# Altium PCB 三代电容_power_1923.PcbDoc
Units mil, origin at the board's own origin, x right, y up, seen from the top; angles counter-clockwise.
Board outline 3228.35 x 2165.35 mil, 2 copper layers (Top Layer, Bottom Layer); 116 components, 52 nets, 297 pads, 572 vias.
Unrouted connection lines stored in the file: 33.
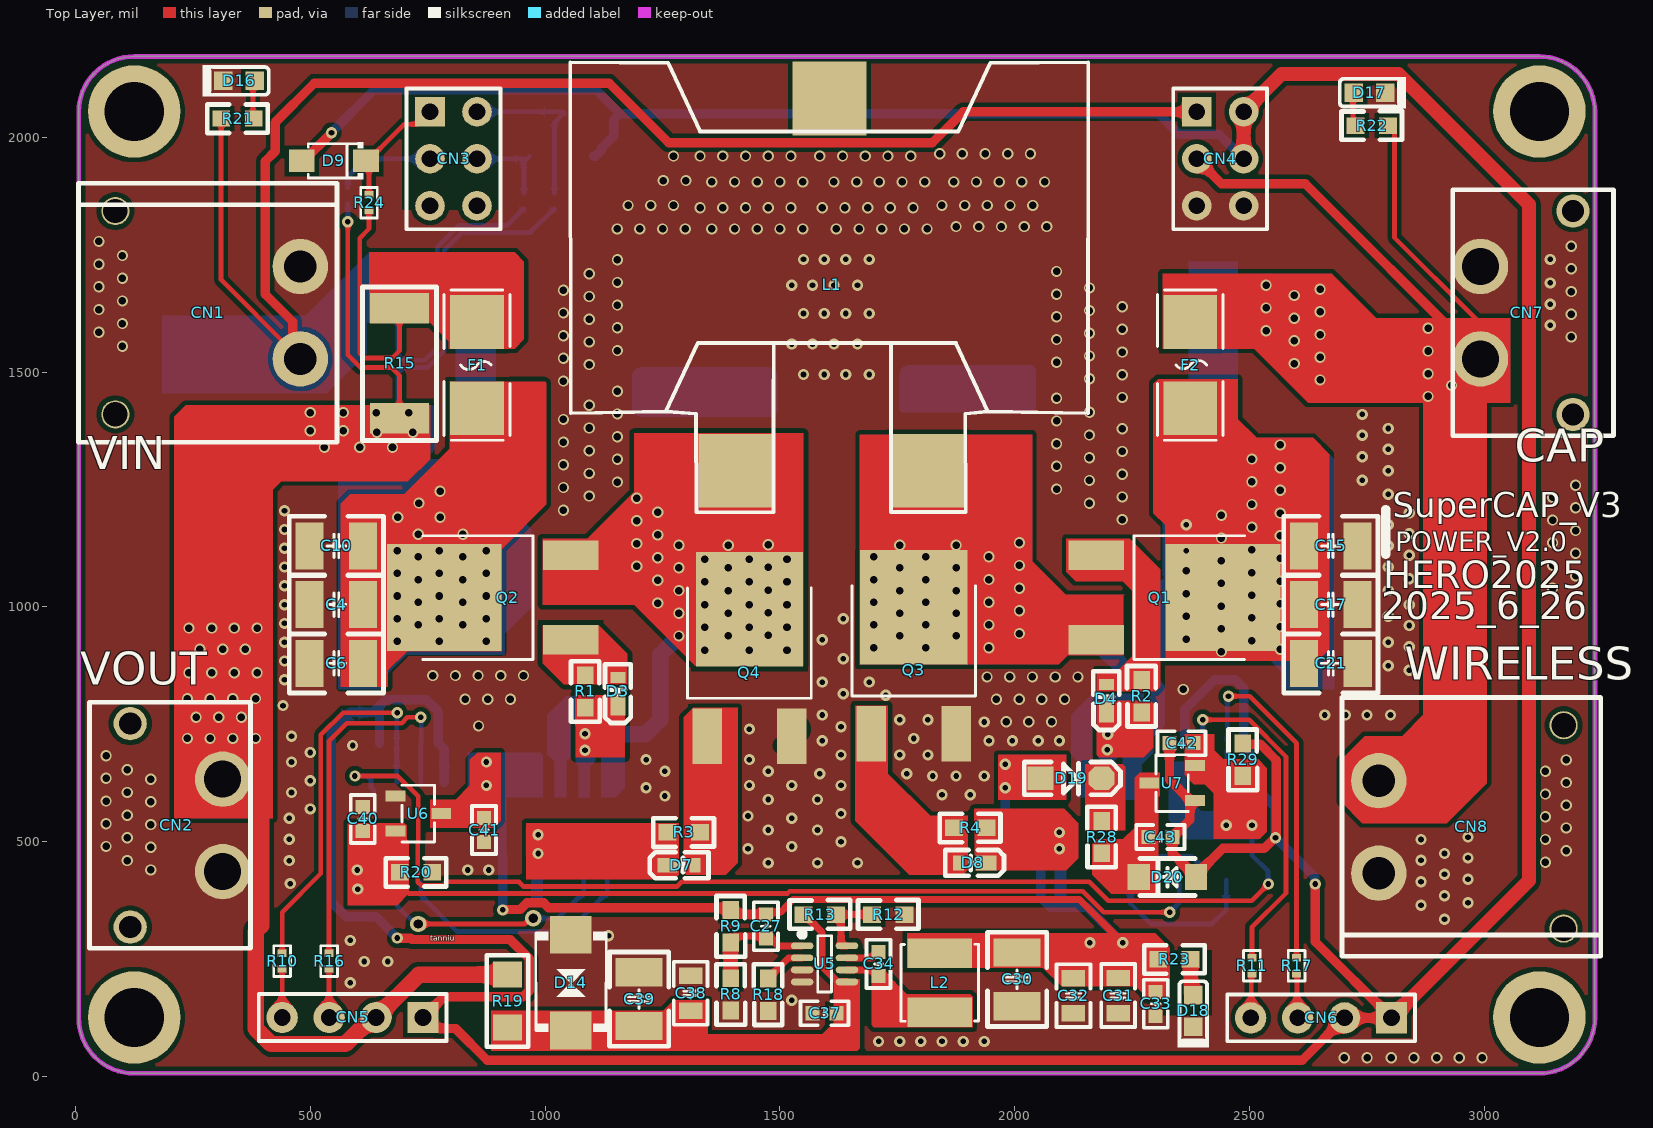
[diagram p0: Top Layer view]
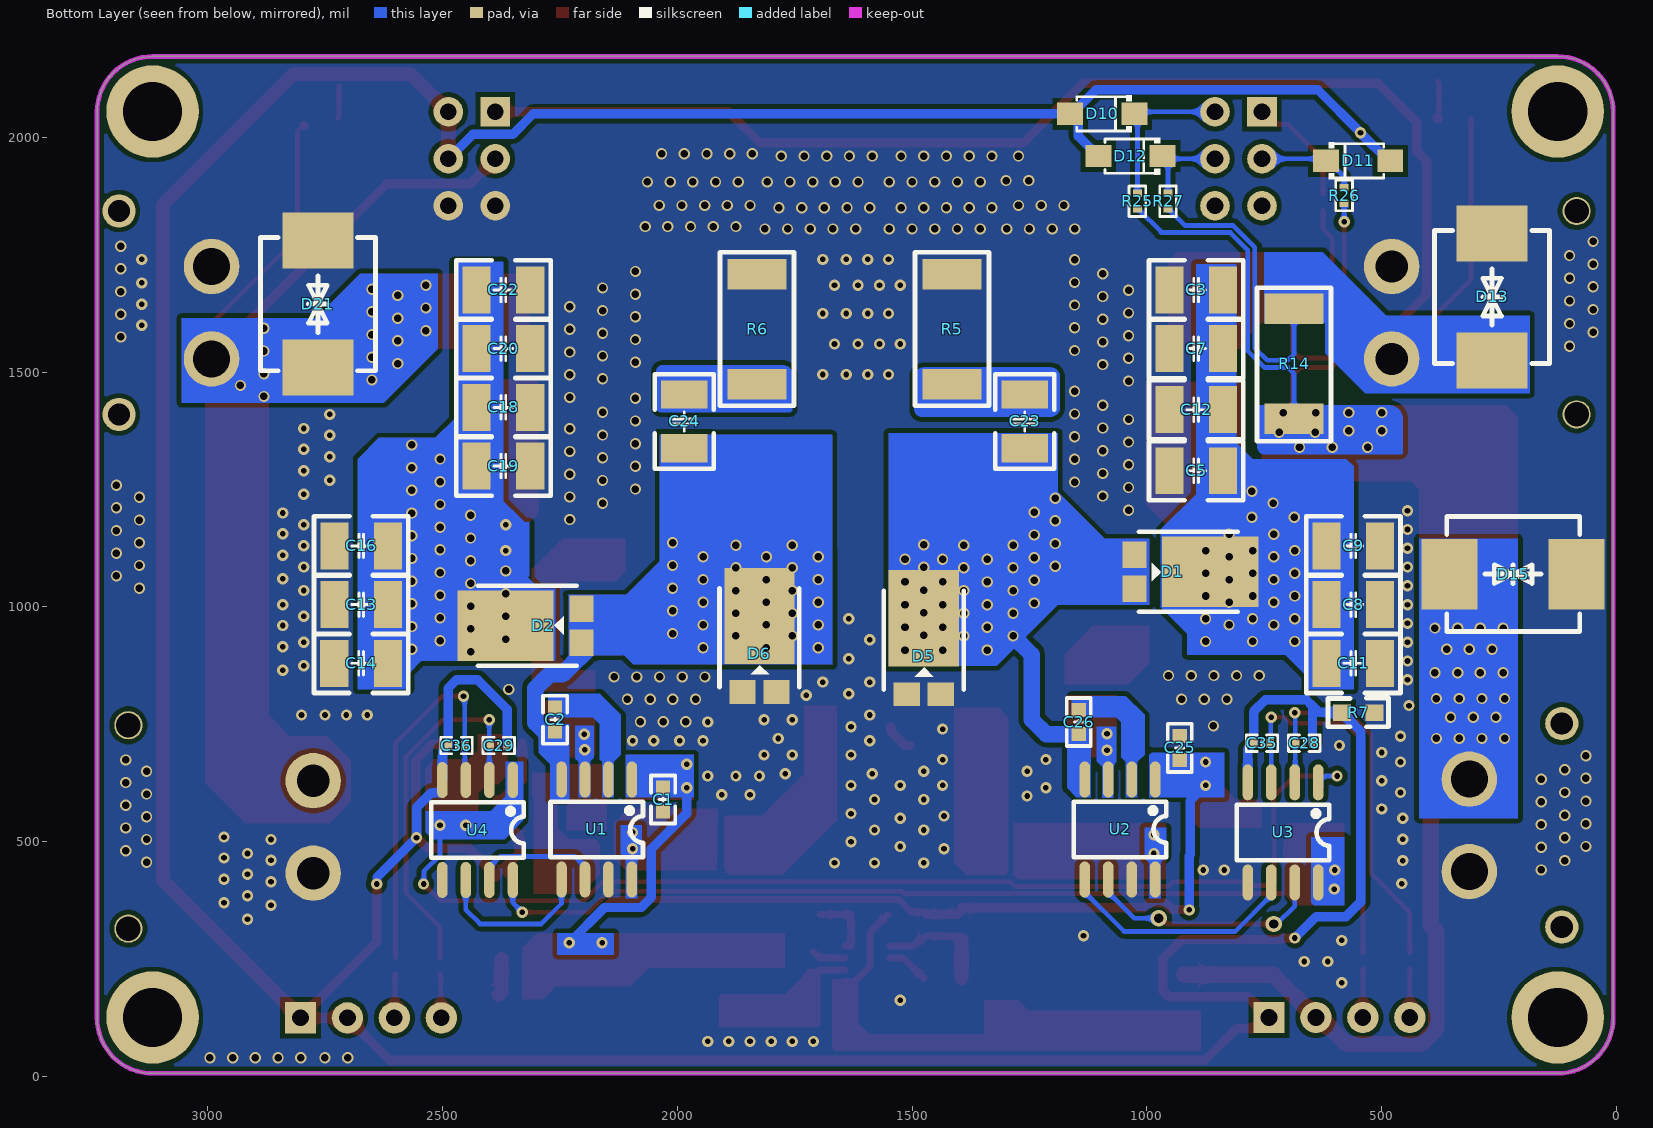
[diagram p1: Bottom Layer view, seen from below]

## Layer stack, top to bottom
Top Solder: solder mask 0.4, Solder Resist, Dk 3.5
Top Layer: signal copper 1.4
Dielectric 1: dielectric 12.6, FR-4, Dk 4.8
Bottom Layer: signal copper 1.4
Bottom Solder: solder mask 0.4, Solder Resist, Dk 3.5

## Board outline
6.89,125 6.89,2054.13 cw(c125,2054.13) 125,2172.24 3117.13,2172.24 cw(c3117.13,2054.13) 3235.24,2054.13 3235.24,125 cw(c3117.13,125) 3117.13,6.89 125,6.89 cw(c125,125)

## Design rules (kind name [scope] priority, off if disabled: settings)
Clearance [All] p1: gap=10 ignorepadtopadclearanceinfootprint=TRUE except(5: Arc-Arc Arc-Track Track-Track; 5.5: Arc-SMDPad Arc-THPad Arc-Via Arc-Text Arc-Hole Track-SMDPad Track-THPad Track-Via Track-Text Track-Hole Fill-Text Poly-Text Region-Text Text-Text; 6: SMDPad-SMDPad SMDPad-THPad SMDPad-Via SMDPad-Text SMDPad-Hole THPad-THPad THPad-Via THPad-Text THPad-Hole Via-Via Via-Text Via-Hole Fill-Hole Poly-Hole Region-Hole Text-Hole)
ComponentClearance [All] p1: gap=1 collisioncheckmode=3 verticalgap=1 showdistances=TRUE
DiffPairsRouting [All] p1: maxlimit=12 minlimit=8 mostfreqgap=10 toplayer_minwidth=8 toplayer_maxwidth=15 toplayer_prefwidth=10 bottomlayer_minwidth=8 bottomlayer_maxwidth=15 bottomlayer_prefwidth=10 maxuncoupledlength=500
HoleSize [All] p1: absolutevalues=TRUE maxlimit=1574.8 minlimit=11.81 maxpercent=80.000 minpercent=20.000
HoleToHoleClearance [All] p1: gap=19.68 allowstackedmicrovias=TRUE
MinimumSolderMaskSliver [All] p1: minsoldermaskwidth=0
NetAntennae [All] p1: netantennaetolerance=1
PasteMaskExpansion [All] p1: expansion=5
PlaneConnect [All] p1: pad.planeconnectstyle=Relief pad.reliefexpansion=20 pad.reliefentries=4 pad.reliefconductorwidth=25 pad.reliefairgap=10 via.planeconnectstyle=Direct via.reliefexpansion=20 via.reliefentries=4 via.reliefconductorwidth=25 via.reliefairgap=10
PolygonConnect [All] p1: connectstyle=Direct reliefconductorwidth=25 reliefentries=4 polygonreliefangle="90 Angle" airgapwidth=10
RoutingVias [All] p1: holewidth=20 width=35 viastyle="Through Hole" minholewidth=11.81 minwidth=23.62 maxholewidth=1574.8 maxwidth=1580.8
SilkToSilkClearance [All] p1: silktosilkclearance=0
SilkToSolderMaskClearance [IsPad] p1: minsilkscreentomaskgap=0 clearancetoexposedcopper=TRUE
SolderMaskExpansion [All] p1: expansion=5 istentingtop=FALSE
Width [All] p1: maxlimit=125 minlimit=5 preferedwidth=20
20 further rules are at their usual default settings.

## Components (designator, comment, footprint, x,y, rotation, side; value= is the part's Value field where it differs from the comment)
C1 "1uF/50V/0603" "C 0603_L" 2030,590 r270 bottom
C2 "1uF/25V/0603" "C 0603_L" 2260,760 r90 bottom
C3 "47uF/50V/1210" "C 1210_L" 895,1675 r0 bottom
C4 "47uF/50V/1210" "C 1210_L" 555.39,1005 r180 top
C5 "47uF/50V/1210" "C 1210_L" 895,1290 r0 bottom
C6 "47uF/50V/1210" "C 1210_L" 555.39,880 r180 top
C7 "47uF/50V/1210" "C 1210_L" 895,1550 r0 bottom
C8 "47uF/50V/1210" "C 1210_L" 560.39,1005 r180 bottom
C9 "47uF/50V/1210" "C 1210_L" 560.39,1130 r180 bottom
C10 "47uF/50V/1210" "C 1210_L" 555.39,1130 r180 top
C11 "47uF/50V/1210" "C 1210_L" 560.39,880 r180 bottom
C12 "47uF/50V/1210" "C 1210_L" 895,1420 r0 bottom
C13 "47uF/100V/1210" "C 1210_L" 2672.91,1005 r0 bottom
C14 "47uF/100V/1210" "C 1210_L" 2673.19,880 r0 bottom
C15 "47uF/100V/1210" "C 1210_L" 2672.91,1130 r0 top
C16 "47uF/100V/1210" "C 1210_L" 2672.91,1130 r0 bottom
C17 "47uF/100V/1210" "C 1210_L" 2672.91,1005 r0 top
C18 "47uF/100V/1210" "C 1210_L" 2370,1425 r180 bottom
C19 "47uF/100V/1210" "C 1210_L" 2370,1300 r180 bottom
C20 "47uF/100V/1210" "C 1210_L" 2370,1550 r180 bottom
C21 "47uF/100V/1210" "C 1210_L" 2673.19,880 r0 top
C22 "47uF/100V/1210" "C 1210_L" 2370,1675 r180 bottom
C23 "1nF/100V/1206" "C 1210_L" 1260,1395 r90 bottom
C24 "1nF/100V/1206" "C 1210_L" 1985,1395 r90 bottom
C25 "1uF/50V/0603" "C 0603_L" 930,700 r90 bottom
C26 "1uF/25V/0603" "C 0603_L" 1145,755 r270 bottom
C27 "22pF/50V/0603" "C 0603_L" 1470,320 r270 top
C28 "22pF/50V/0402" "C 0402_L" 665,710 r0 bottom
C29 "22pF/50V/0402" "C 0402_L" 2380,705 r0 bottom
C30 "47uF/50V/1210" "C 1210_L" 2005,207.09 r270 top
C31 "4.7uF/50V/0805" "C 0805_L" 2220,172.6 r270 top
C32 "1uF/50V/0805" "C 0805_L" 2125,172.4 r270 top
C33 "100nF/50V/0603" "C 0603_L" 2300,155 r270 top
C34 "10nF/50V/0603" "C 0603_L" 1710,240 r90 top
C35 "22pF/50V/0402" "C 0402_L" 755,710 r0 bottom
C36 "22pF/50V/0402" "C 0402_L" 2470,705 r0 bottom
C37 "100nF/50V/0603" "C 0603_L" 1595,135 r180 top
C38 "1uF/50V/0805" "C 0805_L" 1310,177.4 r90 top
C39 "47uF/50V/1210" "C 1210_L" 1200,165 r90 top
C40 "1uF/50V/0603" "C 0603_L" 611.58,548.61 r90 top
C41 "1uF/50V/0603" "C 0603_L" 870,525 r270 top
C42 "1uF/50V/0603" "C 0603_L" 2355,710 r180 top
C43 "1uF/50V/0603" "C 0603_L" 2310,510 r0 top
CN1 "XT30" "XT30 -WS公头" 281.85,1626.54 r90 top
CN2 "XT30" "XT30 -WS母头" 215,535 r90 top
CN3 "排针2*3" HDR2.54-LI-2x3P 804.92,1954.13 r270 top
CN4 "排针2*3" HDR2.54-LI-2x3P 2437.2,1954.13 r270 top
CN5 "排针1*4" HDR2.54-LI-4P 589.96,125.87 r180 top
CN6 "排针1*4" HDR2.54-LI-4P 2652.17,125 r180 top
CN7 "XT30" "XT30 -WS母头" 3090,1626.53 r270 top
CN8 "XT30" "XT30 -WS公头" 2971.85,531.57 r270 top
D1 "SB10150_C2922190" TO-277_3P-L5.4-W4.0-LS6.5-TR 945.85,1075 r0 bottom
D2 "SB10150_C2922190" TO-277_3P-L5.4-W4.0-LS6.5-TR 2285,960 r180 bottom
D3 "CDBVRL140-HF" LED-SMD_L1.6-W0.8-RD-2 1155,820 r90 top
D4 "CDBVRL140-HF" LED-SMD_L1.6-W0.8-RD-2 2195,805 r90 top
D5 "SB10150_C2922190" TO-277_3P-L5.4-W4.0-LS6.5-TR 1475,895 r270 bottom
D6 "SB10150_C2922190" TO-277_3P-L5.4-W4.0-LS6.5-TR 1825,900 r270 bottom
D7 "CDBVRL140-HF" LED-SMD_L1.6-W0.8-RD-2 1290,450 r0 top
D8 "CDBVRL140-HF" LED-SMD_L1.6-W0.8-RD-2 1910,455 r180 top
D9 "SMF50A" SOD-123FL_L2.7-W1.8-LS3.8-RD 550,1950 r180 top
D10 "SMF50A" SOD-123FL_L2.7-W1.8-LS3.8-RD 1095,2050 r0 bottom
D11 "SMF50A" SOD-123FL_L2.7-W1.8-LS3.8-RD 550,1950 r180 bottom
D12 "SMF50A" SOD-123FL_L2.7-W1.8-LS3.8-RD 1035,1960 r0 bottom
D13 "SMCJ30CA" SMC_L6.9-W5.9-LS7.9-BI 265,1660 r270 bottom
D14 "SMBJ30CA" SMB_L4.3-W3.6-LS5.4-BI 1055,200 r90 top
D15 "SMCJ30CA" SMC_L6.9-W5.9-LS7.9-BI 220,1070 r0 bottom
D16 "LED" LED_0603 348.47,2120 r0 top
D17 "LED" LED_0603 2755,2095 r180 top
D18 "LED" LED_0603 2380,140 r90 top
D19 "SS14" SOD-123 2120,635 r0 top
D20 "SMF17A" SOD-123FL_L2.8-W1.8-LS3.6-RD 2325,425 r0 top
D21 "SMCJ30CA" SMC_L6.9-W5.9-LS7.9-BI 2765,1645 r270 bottom
F1 "FUSE_18A" FUSE-SMD_L6.1-W2.6 855,1515 r270 top
F2 "FUSE_18A" FUSE-SMD_L6.1-W2.6 2373.58,1515 r90 top
L1 "22uH/30A" PQ2918贴片式 1610,1772.24 r0 top
L2 "33uH/0.9A" IND-SMD_L4.0-W4.0 1840,200 r90 top
Q1 "AOD66923" TO-252-2_L6.6-W6.1-P4.57-LS9.9-BR-CW 2308.58,1020 r180 top
Q2 "AOD66923" TO-252-2_L6.6-W6.1-P4.57-LS9.9-BR-CW 920,1020 r0 top
Q3 "AOD66923" TO-252-2_L6.6-W6.1-P4.57-LS9.9-BR-CW 1784.84,864.81 r270 top
Q4 "AOD66923" TO-252-2_L6.6-W6.1-P4.57-LS9.9-BR-CW 1435,860 r270 top
R1 "10R/0603" "R 0603_L" 1085,820 r90 top
R2 "10R/0603" "R 0603_L" 2270,810 r270 top
R3 "10R/0603" "R 0603_L" 1295,520 r0 top
R4 "10R/0603" "R 0603_L" 1905,530 r0 top
R5 "15R/2010/1W" "R 2512_L" 1415,1590 r90 bottom
R6 "15R/2010/1W" "R 2512_L" 1830,1590 r90 bottom
R7 "0R/0603" "R 0603_L" 550,775 r0 bottom
R8 "10k/0603" "R 0603_L" 1395,175 r90 top
R9 "205k/0603" "R 0603_L" 1395,320 r90 top
R10 "0R/0402" "R 0402_L" 440,245 r90 top
R11 "0R/0402" "R 0402_L" 2505,235 r90 top
R12 "30k/0603" "R 0603_L" 1730.5,345 r180 top
R13 "100k/0603" "R 0603_L" 1585,345 r180 top
R14 "3mR/2512/3W" "R 2512_L" 686.63,1518.47 r270 bottom
R15 "3mR/2512/3W" "R 2512_L" 690,1520 r270 top
R16 "0R/0402" "R 0402_L" 540,245 r90 top
R17 "0R/0402" "R 0402_L" 2600,235 r90 top
R18 "47k/0603" "R 0603_L" 1475,174.5 r270 top
R19 "0R/1206/0.25w" "R 1206_L" 920,160 r90 top
R20 "27k/0603" "R 0603_L" 725,435 r0 top
R21 "47k/0603" "R 0603_L" 345,2040 r0 top
R22 "47k/0603" "R 0603_L" 2760,2025 r180 top
R23 "10k/0603" "R 0603_L" 2340,250 r0 top
R24 "1R/0402" "R 0402_L" 625,1860 r90 top
R25 "1R/0402" "R 0402_L" 1020,1865 r270 bottom
R26 "1R/0402" "R 0402_L" 580,1875 r90 bottom
R27 "1R/0402" "R 0402_L" 955,1865 r270 bottom
R28 "100R/0603" "R 0603_L" 2185,510 r270 top
R29 "27k/0603" "R 0603_L" 2485,674.5 r90 top
U1 "MP1923GS-Z" SOIC-8_L5.0-W4.0-P1.27-LS6.0-BL 2171.38,526.26 r0 bottom
U2 "MP1923GS-Z" SOIC-8_L5.0-W4.0-P1.27-LS6.0-BL 1057.2,526.26 r0 bottom
U3 "π120U31" SOIC-8_L5.0-W4.0-P1.27-LS6.0-BL 710,520 r0 bottom
U4 "π120U31" SOIC-8_L5.0-W4.0-P1.27-LS6.0-BL 2425,525 r0 bottom
U5 "SY8303AIC" TSOT-23-8_L2.9-W1.6-P0.65-LS2.8-BR 1595,240 r180 top
U6 "SE8650X2-HF" SOT-23-3_L2.9-W1.6-P1.90-LS2.8-BR 730,560 r180 top
U7 "SE8650X2-HF" SOT-23-3_L2.9-W1.6-P1.90-LS2.8-BR 2335,625 r0 top

## Footprints (in the part's own frame and the unit in brackets; to place one, negate y for a bottom-side part, rotate by r counter-clockwise, add the part's x,y. Pads: shape width x height; smd on the part's side, far side on the other; paste and mask are expansions set on the pad)
"C 0402_L" [mm] "无极性贴片电容"
  rect 0.4x0.5 smd: 1(-0.45,0) 2(0.45,0)
  silkscreen extent -0.86,-0.45 0.85,0.45, body extent -0.5,-0.26 0.5,0.26, height 0.53
"C 0603_L" [mil] "无极性贴片电容"
  rect 30x30 smd: 1(-25.59,0) 2(25.59,0)
  silkscreen extent -51,-26 51,26, body extent -31,-16 31,16, height 32
"C 0805_L" [mil] "无极性贴片电容"
  rect 35x50 smd: 1(-37.4,0) 2(37.4,0)
  silkscreen extent -67,-36 67,36, body extent -39,-24 39,24, height 20
"C 1210_L" [mil] "无极性贴片电容"
  rect 60x100 smd: 1(-57.09,0) 2(57.09,0)
  silkscreen extent -100,-63 100,63, body extent -63,-51 63,51, height 60
FUSE-SMD_L6.1-W2.6 [mil]
  rect 114.6x114.6 smd mask+2: 1(-91.7,0) 2(91.7,0)
  silkscreen extent -160,-70 160,70, body extent -120,-53 120,53, height 109
HDR2.54-LI-2x3P [mm]
  rect 1.6x1.6 hole 0.9: 1(-2.54,-1.27)
  round 1.6 hole 0.9: 2(-2.54,1.27) 3(0,-1.27) 4(0,1.27) 5(2.54,-1.27) 6(2.54,1.27)
  silkscreen extent -3.81,-2.54 3.81,2.54, body extent -3.81,-2.54 3.81,2.54, height 8.5
HDR2.54-LI-4P [mm] "排针，4脚"
  rect 1.7x1.7 hole 0.9: 1(-3.81,0)
  round 1.7 hole 0.9: 2(-1.27,0) 3(1.27,0) 4(3.81,0)
  silkscreen extent -5.08,-1.27 5.08,1.27, body extent -5.08,-1.27 5.08,1.27, height 8.5
IND-SMD_L4.0-W4.0 [mm]
  rect 1.6x3.5 smd: 1(-1.6,0) 2(1.6,0)
  silkscreen extent -2.08,-2.1 2.08,2.1
LED-SMD_L1.6-W0.8-RD-2 [mm]
  rect 0.6x0.8 smd: 1(0.75,0)
  rect 1.1x0.8 smd: 2(-0.75,0)
  silkscreen extent -1.7,-0.7 1.47,0.7
LED_0603 [mm]
  rect 1x1 smd paste+0 mask+0: 1(0.85,0) 2(-0.85,0)
  silkscreen extent -1.97,-0.85 1.6,0.85, body extent -0.92,-0.53 1.09,0.53, height 0.46
PQ2918贴片式 [mm] "功率电感封装"
  rect 4x4 smd: 0(-0.109,7.882) 1(-5.207,-12.249) 2(5.207,-12.249)
  silkscreen extent -14.14,-14.5 13.87,9.84, body extent -13.95,-15.77 13.95,11.27, height 17.72
"R 0402_L" [mm] "1/16W贴片电阻"
  rect 0.4x0.5 smd: 1(-0.4,0) 2(0.45,0)
  silkscreen extent -0.8,-0.45 0.85,0.45, body extent -0.5,-0.25 0.5,0.25, height 0.3
"R 0603_L" [mil] "1/10W"
  rect 38x35 smd: 1(-34.5,0) 2(34.5,0)
  silkscreen extent -64,-31 64,30, body extent -34,-16 28,16, height 18
"R 1206_L" [mil] "1/4W高精度贴片电阻"
  rect 55x62 smd: 1(-55.12,0) 2(57.09,0)
  silkscreen extent -96,-44 98,44, body extent -63,-31 63,32, height 22
"R 2512_L" [mm] "1W高精度贴片电阻"
  rect 1.65x3.2 smd: 1(-2.95,0) 2(3,0)
  silkscreen extent -4.1,-2 4.2,2, body extent -3.2,-1.6 3.2,1.6, height 0.55
SMB_L4.3-W3.6-LS5.4-BI [mil]
  rect 80.61x88.23 smd: 1(-102.02,0) 2(102.02,0)
  silkscreen extent -105,-75 108,75
SMC_L6.9-W5.9-LS7.9-BI [mm]
  rect 3.03x3.82 smd mask+0.051: 1(-3.435,0) 2(3.435,0)
  silkscreen extent -3.6,-3.11 3.6,3.11, body extent -3.94,-2.9 3.96,2.9, height 2.45
SOD-123 [mil] "2.7x1.6X1.1mm（长宽高，不包括引脚）"
  rect 55x50 smd: 1(-65,0)
  oct 55x50 smd: 2(65,0)
  silkscreen extent -100,-35 105,35, body extent -73,-31 73,31, height 48
SOD-123FL_L2.7-W1.8-LS3.8-RD [mm]
  rect 1.4x1.2 smd: 1(-1.735,0) 2(1.735,0)
  silkscreen extent -1.6,-1 1.38,1
SOD-123FL_L2.8-W1.8-LS3.6-RD [mm]
  rect 1.2x1.4 smd: 1(-1.55,0) 2(1.55,0)
  silkscreen extent -1.5,-1 1.5,1
SOIC-8_L5.0-W4.0-P1.27-LS6.0-BL [mil]
  oval 22.38x76.78 smd: 1(-75,-106.5) 2(-25,-106.5) 3(25,-106.5) 4(75,-106.5) 5(75,106.5) 6(25,106.5) 7(-25,106.5) 8(-75,106.5)
  silkscreen extent -98,-59 98,59
SOT-23-3_L2.9-W1.6-P1.90-LS2.8-BR [mm]
  rect 1.07x0.6 smd: 1(1.235,-0.95) 2(1.235,0.95) 3(-1.235,0)
  silkscreen extent -0.88,-1.54 0.88,1.54
TO-252-2_L6.6-W6.1-P4.57-LS9.9-BR-CW [mm]
  rect 3x1.6 smd mask+0.051: 1(3.424,-2.29) 3(3.424,2.29)
  rect 6.2x5.8 smd mask+0.051: 2(-3.424,0)
  silkscreen extent -4.58,-3.35 1.38,3.35, body extent -6,-3.29 3.7,3.29, height 2.3
TO-277_3P-L5.4-W4.0-LS6.5-TR [mm]
  rect 1.29x1.422 smd: 1(2.054,0.92) 3(2.054,-0.92)
  rect 5.2x3.8 smd: 2(-2.054,0)
  silkscreen extent -3.54,-2.16 1.8,2.16
TSOT-23-8_L2.9-W1.6-P0.65-LS2.8-BR [mil]
  oval 48.1x14.3 smd mask+2: 1(47.7,-38.4) 2(47.7,-12.8) 3(47.7,12.8) 4(47.7,38.4) 5(-47.7,38.4) 6(-47.7,12.8) 7(-47.7,-12.8) 8(-47.7,-38.4)
  silkscreen extent -15,-69 54,60, body extent -55,-57 55,57, height 39
"XT30 -WS公头" [mm]
  round 3 hole 1.74: 1(-2.5,-5) 2(2.5,-5)
  round 1.524 hole 1.321: x(-5.5,5) x(5.5,5)
  silkscreen extent -7,-6.98 7,7, body extent -6.78,-6.22 6.52,7.73, height 5
"XT30 -WS母头" [mm]
  round 1.8 hole 1.2: 0(-5.5,2.5) 0(5.5,2.5)
  round 3 hole 2: 1(2.5,-2.5) 2(-2.5,-2.5)
  silkscreen extent -6.65,-4 6.65,4.7, body extent -6.65,-3.52 6.65,10.52, height 5.1

## Part data
C1 C2 C25 C26 C28 C29 C35 C36 C40 C41 C42 C43: library part CAP, "陶瓷电容Ceramic Capacitor;16V;X7R;1206"
C3 C4 C5 C6 C7 C8 C9 C10 C11 C12 C13 C14 C15 C16 C17 C18 C19 C20 C21 C22 C23 C24 C27 C30 C31 C32 C33 C34 C37 C38 C39: library part CAP, "陶瓷电容"
CN1 CN2 CN7 CN8: "电源端子", BOM_Manufacturer="Changzhou Amass Elec", BOM_Manufacturer Part=XT30UPB-F, BOM_Supplier=LCSC, BOM_Supplier Part=C108769, Contributor=LCSC, nameAlias=Value, spicePre=C, spiceSymbolName=XT30UPB-F
CN3 CN4 CN5 CN6: "2.54排针"
D1 D2 D5 D6: "10A肖特基", Average Rectified Current (Io)=10A, Forward Voltage (Vf@If)=900mV@10A, JLCPCB Part Class="Extended Part", LCSC Part Name="电压:150V 电流:10A", Manufacturer=GOODWORK(固得沃克), Manufacturer Part=SB10150, Reverse Leakage Current (Ir)=20uA@150V, Reverse Voltage (Vr)=150V, Add into BOM=yes, Convert to PCB=yes, Datasheet=https://atta.szlcsc.com/upload/public/pdf/source/20211009/AF8C3589B27F0CCB5AD5E667BFB17F78.pdf, Device=SB10150_C2922190, Diode Configuration=独立式, Supplier=LCSC, Supplier Footprint=TO-277, Supplier Part=C2922190, Symbol=SB10150_C2922190
D3 D4 D7 D8: Forward Voltage (Vf@If)=550mV@700mA, JLCPCB Part Class="Extended Part", LCSC Part Name="电压:40V 电流:1A", Manufacturer=Comchip(典琦), Rectified Current=1A, Reverse Leakage Current (Ir)=50uA@40V, Reverse Voltage (Vr)=40V, Add into BOM=yes, Convert to PCB=yes, Datasheet=https://atta.szlcsc.com/upload/public/pdf/source/20240116/3D60EEEEF0718EF97C1BF0B00CBFA01B.pdf, Device=CDBVRL140-HF, Manufacturer Part=CDBVRL140-HF, Supplier=LCSC, Supplier Footprint=0603, Supplier Part=C3758192, Symbol=CDBVRL140-HF
D9 D10 D11 D12: library part SMF30A_C19077518, "单向 30V", Breakdown Voltage=33.3V, JLCPCB Part Class="Extended Part", LCSC Part Name=SMF30A, Manufacturer=宏迦橙, Maximum Clamping Voltage=48.4V, Operating Temperature=-55℃~+155℃, Peak Pulse Current (Ipp)=4.1A, Peak Pulse Power Dissipation (Ppp)=200W, Reverse Leakage Current (Ir)=1uA, Reverse Stand-Off Voltage (Vrwm)=30V, Add into BOM=yes, Convert to PCB=yes, Datasheet=https://atta.szlcsc.com/upload/public/pdf/source/20241029/BBF9A11676F655A5C9D4546A153AB943.pdf, Device=SMF30A_C19077518, Manufacturer Part=SMF30A, Number of Lines=单路, Polarity=单向, Supplier=LCSC, Supplier Footprint=SOD-123FL, Supplier Part=C19077518, Symbol=SMF30A_C19077518, Type=TVS
D13 D15: library part SMCJ36CA, "TVS 双向 26V", Breakdown Voltage (Min)=40V, JLCPCB Part Class="Extended Part", LCSC Part Name="双向 36V", Manufacturer=FTR(乔光电子), Maximum Clamping Voltage=58.1V, Peak Pulse Current (Ipp)@10/1000μs=25.9A, Reverse Stand-Off Voltage (Vrwm)=36V, Add into BOM=yes, Convert to PCB=yes, Datasheet=https://atta.szlcsc.com/upload/public/pdf/source/20200701/C693507_A69D3CDD819DBFEBDB935C1CCCEED4E5.pdf, Device=SMCJ36CA, Manufacturer Part=SMCJ36CA, Name=SMCJ36CA, Polarity=双向, Supplier=LCSC, Supplier Footprint=SMC(DO-214AB), Supplier Part=C693507, Symbol=SMCJ36CA_C693507
D14: library part SMBJ30CA_C83847, Breakdown Voltage=33.3V, JLCPCB Part Class="Extended Part", Manufacturer=Littelfuse(美国力特), Maximum Clamping Voltage=48.4V, Peak Pulse Current (Ipp)@10/1000us=12.4A, Peak Pulse Power Dissipation (Ppp)@10/1000us=600W, Reverse Stand-Off Voltage (Vrwm)=30V, Add into BOM=yes, Convert to PCB=yes, Datasheet=https://atta.szlcsc.com/upload/public/pdf/source/20190807/C409416_D98C874D944FBE9BE31A2BD6B7A21533.pdf, Device=SMBJ30CA_C83847, LCSC Part Name=SMBJ30CA, Manufacturer Part=SMBJ30CA, Supplier=LCSC, Supplier Footprint=SMB(DO-214AA), Supplier Part=C83847, Symbol=SMBJ30CA_C83847, Type=TVS
D16 D17 D18: "发光二极管"
D19: "肖特基二极管", BOM名称=肖特基二极管, 属性=40V/1A
D20: library part SMF17A_C2857278, "17V 单向", Breakdown Voltage=18.9V, JLCPCB Part Class="Extended Part", Manufacturer=JSMSEMI(杰盛微), Maximum Clamping Voltage=27.6V, Peak Pulse Current (Ipp)=7.2A, Reverse Leakage Current (Ir)=1uA, Reverse Stand-Off Voltage (Vrwm)=17V, Add into BOM=yes, Convert to PCB=yes, Datasheet=https://atta.szlcsc.com/upload/public/pdf/source/20220120/4066B4D37095FB947F97BAEB950D8525.pdf, Device=SMF17A_C2857278, LCSC Part Name=SMF17A, Manufacturer Part=SMF17A, Supplier=LCSC, Supplier Footprint=SOD-123FL, Supplier Part=C2857278, Symbol=SMF17A_C2857278, Type=TVS
D21: library part SMCJ54CA, "TVS 双向 30V", Breakdown Voltage (Min)=40V, JLCPCB Part Class="Extended Part", LCSC Part Name="双向 36V", Manufacturer=FTR(乔光电子), Manufacturer Part=SMCJ36CA, Maximum Clamping Voltage=58.1V, Peak Pulse Current (Ipp)@10/1000μs=25.9A, Reverse Stand-Off Voltage (Vrwm)=36V, Add into BOM=yes, Convert to PCB=yes, Datasheet=https://atta.szlcsc.com/upload/public/pdf/source/20200701/C693507_A69D3CDD819DBFEBDB935C1CCCEED4E5.pdf, Device=SMCJ36CA, Name=SMCJ36CA, Polarity=双向, Supplier=LCSC, Supplier Footprint=SMC(DO-214AB), Supplier Part=C693507, Symbol=SMCJ36CA_C693507
F1 F2: library part FUSE, "保险丝", Breaking Capacity @ Rated Voltage=50A, Current Rating=5A, JLCPCB Part Class="Extended Part", LCSC Part Name="5A 125V 超快断", Manufacturer=Littelfuse(美国力特), Manufacturer Part=0451005.MRL, Nominal Cold Resistance=12.5mΩ, Nominal Voltage Drop=-, Operating Temperature="-55°C ~ 125°C", Rated Voltage(AC)=125V, Add into BOM=yes, Convert to PCB=yes, Datasheet=https://atta.szlcsc.com/upload/public/pdf/source/20171109/C48467_15102201734031103760.pdf, Device=0451005.MRL, Fuse Type=快速熔断, Melting I²t=5.566, Name=0451005.MRL, Product=贴片式保险丝, Supplier=LCSC, Supplier Footprint=SMD, Supplier Part=C48467, Symbol=0451005.MRL
L1: library part L-FWHC, "扁平线大电流电感", BOM名称=功率磁环电感
L2: library part L-SMDP, "贴片功率电感", BOM名称=功率电感
Q1 Q2 Q3 Q4: "NMOS 100V 58A", BOM_JLCPCB Part Class="Extended Part", BOM_Manufacturer="Yangzhou Yangjie Elec Tech", BOM_Manufacturer Part=YJL3400A, BOM_Supplier=LCSC, BOM_Supplier Part=C699302, Contributor=LCSC, spicePre=Q, spiceSymbolName=YJL3400A
R1 R2 R3 R4 R7 R8 R9 R10 R11 R12 R13 R16 R17 R18 R20 R21 R22 R23 R24 R25 R26 R27 R28 R29: library part RES, "贴片电阻"
R5 R6 R14 R15 R19: library part RES_P, "功率电阻"
U1 U2: JLCPCB Part Class="Extended Part", LCSC Part Name=电源IC, Manufacturer=SCT(芯洲科技), Manufacturer Part=SCT2450STER, Add into BOM=yes, Convert to PCB=yes, Datasheet=https://atta.szlcsc.com/upload/public/pdf/source/20200407/C509400_EDF779A672A59398CFBA9E95FA584FEC.pdf, Device=SCT2450STER, Supplier=LCSC, Supplier Footprint=ESOP-8, Supplier Part=C509400, Symbol=SCT2450STER
U3 U4: "隔离器", Isolation Voltage(Vrms)=3000, JLCPCB Part Class="Extended Part", LCSC Part Name="增强型ESD 3.0kVrms/6.0kVrms 150Kbps双通道数字隔离器", Manufacturer="2Pai Semi(荣湃)", Add into BOM=yes, Convert to PCB=yes, Data Rate(Max)=150Kbps, Datasheet=https://atta.szlcsc.com/upload/public/pdf/source/20191223/C471588_CD8CD4905F4DCC0F3407249B7C47B378.pdf, Device=π120U31, Manufacturer Part=π120U31, Number of Forward Channels=2, Number of Reverse Channels=0, Supplier=LCSC, Supplier Footprint=SOIC-8, Supplier Part=C471588, Symbol=π120U31
U5: "DCDC ADJ 3A", Input Voltage=-, JLCPCB Part Class="Extended Part", LCSC Part Name=降压型, Manufacturer=矽力杰silergy, Add into BOM=yes, Convert to PCB=yes, Datasheet=https://atta.szlcsc.com/upload/public/pdf/source/20170308/1488958431714.pdf, Device=SY8303AIC, Function=降压型, Manufacturer Part=SY8303AIC, Name=SY8303AIC, Number of Outputs=-, Output Current (Max)=-, Supplier=LCSC, Supplier Footprint=TSOT-23-8, Supplier Part=C97054, Switching Frequency=-, Symbol=SY8303AIC, Synchronous Rectification=-, Topology=-
U6 U7: "5V_LDO", JLCPCB Part Class="Extended Part", LCSC Part Name="输入80V 输出5V 200mA", Manufacturer=SEAWARD(思旺), Output Current=-, Output Voltage=5V, standby current=2uA, Voltage - Supply=80V, Voltage Dropout=700mV@(100mA), Add into BOM=yes, Convert to PCB=yes, Datasheet=https://atta.szlcsc.com/upload/public/pdf/source/20231204/E5912244F6D9E24D718D6BDA01187AC7.pdf, Device=SE8650X2-HF, Features=短路保护(SCP)；低ESR；热关断(TSD)；带使能, Manufacturer Part=SE8650X2-HF, Number of Outputs=1, Output Configuration=正极, Output Type=固定, Power Supply Rejection Ratio (PSRR)=-, Supplier=LCSC, Supplier Footprint=SOT-23, Supplier Part=C496615, Symbol=SE8650X2-HF

## Free pads (board coordinates)
  round 196.85 hole 125.98: 6(125,125.87) 6(125,2055) 6(3117.13,2055) 6(3117.13,125.87)

## Via types
v1: diameter 24, hole 16, Top Layer to Bottom Layer, tented both sides, 387 vias
v2: diameter 24, hole 12, Top Layer to Bottom Layer, 183 vias
v3: diameter 35, hole 20, Top Layer to Bottom Layer, 2 vias

## Nets (pads, with @x,y where several pads share a name; then routed paths per layer and width w, separated by ;. In a path a pad name is that pad's centre, name@x,y a point inside that pad or via, vN(x,y) a via of type N, cw(c..) or ccw(c..) an arc to the next point about the centre after c; other vN are vias at no path point)
D_INH1: CN5.3 R16.1 | length 103.4
  Top Layer w10: CN5.3 R16.1
D_INH2: CN6.3 R17.1 | length 95.1
  Top Layer w10: R17.1 2601.08,218.17 2601.08,126.08 CN6.3
D_INL1: CN5.4 R10.1 | length 103.4
  Top Layer w10: CN5.4 R10.1
D_INL2: CN6.4 R11.1 | length 95.4
  Top Layer w10: CN6.4 2503.58,126.42 2503.58,217.83 R11.1
DVCC5V: C42.1 R29.1 U3.1 U4.1 U7.2 | length 2407.1
  Top Layer w10: v2(595,640) 686.5,640 730,596.5 730,500.44 729.08,499.52 729.08,414.08 730,415 730,413.15 736.15,407 782.85,407 789,413.15 789,415 945,415 945,413.79 953.79,405 1281.21,405 1291.21,415 2158.79,415 2199.22,374.57 2504.57,374.57 v2(2540,410)
  Bottom Layer w10: v2(595,640) 620,640 629.28,630.72 629.28,615 635,609.28 U3.1@635,600 ; v2(2505,535) 2505,471.37 2539.37,437 2539.37,410.63 v2(2540,410)
  other v2: 2450,535
GND: C28.1 C29.1 C35.2 C36.2 C42.2 C43.2 CN4.2 CN4.4 CN5.1 CN6.1 CN6.2 D9.2 D10.2 D11.2 D12.2 D20.2 R7.2 R29.2 U3.4 U4.4 U7.1 | length 10725.9
  Top Layer w20: D9.2 485.63,1950 545,2009.37 v2(545,2010) ; v2(685,295) 685.77,294.23 714.1,294.23 716.33,292 925.51,292 966.5,251.01 966.5,183.17 953.04,169.71 840.9,169.71 840.6,170 784.09,170 CN5.1 763.43,102.4 809.31,102.4 876.72,35 2612.17,35 CN6.2 CN6.1 2640,287.17 v2(2640,410) ; C42.2 2329.41,632.56 U7.1@2374.37,587.6 ; U7.1 U7.1@2374.37,587.6 ; D20.2 D20.2@2386.02,428.94 ; R29.2 2485,707.5 2523,707.5 2556.86,673.64 2556.86,511.52 2555.77,510.43 2555,510.43 v2(2555,508.58) 2553.92,508.58 2531.59,486.26 2443.34,486.26 D20.2@2386.02,428.94 ; U7.1@2374.37,587.6 2372.56,585.79 2372.56,546.97 C43.2 2335.59,475.43 2368.46,442.56 2372.4,442.56 D20.2@2386.02,428.94
  Top Layer w30: CN4.4 CN4.2 2568.26,2135.18 2816.64,2135.18 3095,1856.83 3095,417.83 CN6.1
  Bottom Layer w20: D11.2 485.63,1950 545,2009.37 v2(545,2010) 636.13,2101.13 1108.24,2101.13 D10.2@1159.37,2050 ; C28.1 647.28,789.29 ; v2(685,295) 639.23,340.77 575.95,340.77 545,371.72 545,735.5 575.5,766 575.5,767.5 583,775 R7.2 585,775.5 633.5,775.5 647.28,789.29 ; U3.4 785,697.72 C35.2 772.71,777.29 747.5,802.5 660.5,802.5 647.28,789.29 ; D12.2 1107.25,1960 1120.87,1973.62 1120.87,1977.56 1145.75,2002.44 1145.75,2036.38 D10.2@1159.37,2050 ; C29.1 2362.28,782.28 2425,845 2470,845 2487.71,827.29 C36.2 2499.55,693.17 2499.55,631.95 U4.4 2500,604.94 2501.1,603.84 2524.44,603.84 2555,573.28 v2(2555,508.58) 2639.23,424.35 2639.23,410.77 v2(2640,410) ; CN4.4 2435.16,2006.18 2350.25,2006.18 2306.43,2050 D10.2 D10.2@1159.37,2050
HO1: D3.2 R1.1 U2.3
  other v2: 1085,695 1085,730
HO2: D4.2 R2.2 U1.3
  other v2: 2196.78,695.95 2197.98,728.84
LO1: D7.2 R3.1 U2.8
  other v2: 985,475 985,515
LO2: D8.2 R4.2 U1.8
  other v2: 2095,485 2095,520
NetC2_2: C2.2 U1.2
NetC3_1: C3.1 C4.1 C5.1 C6.1 C7.1 C8.1 C9.1 C10.1 C11.1 C12.1 D1.2 F1.2 Q2.2
  other v1: 685,926.67 775,926.67 875,926.67 730,961.67 825,961.67 685,975 775,975 875,975 730,1010 825,1010 685,1023.33 775,1023.33 875,1023.33 730,1058.33 825,1058.33 685,1071.67 775,1071.67 875,1071.67 730,1106.67 825,1106.67 685,1120 775,1120 875,1120 730,1155 825,1155 686.2,1191.21 776.2,1191.21 731.2,1221.21 776.2,1246.21
NetC13_1: C13.1 C14.1 C15.1 C16.1 C17.1 C18.1 C19.1 C20.1 C21.1 C22.1 D2.2 F2.1 Q1.2
  other v1: 2440,905 2565,910 2505,928.33 2365,931.67 2440,953.33 2565,958.33 2505,976.67 2365,980 2440,1001.67 2565,1006.67 2505,1025 2365,1028.33 2440,1050 2565,1055 2505,1073.33 2365,1076.67 2440,1098.33 2565,1103.33 2505,1121.67 2440,1146.67 2565,1151.67 2505,1170 2440,1195 2565,1200 2505,1218.33 2565,1248.33 2505,1266.67 2565,1296.67 2505,1315 2565,1345
  other v2: 2365,1120 2365,1175
NetC23_2: C23.2 R5.1
NetC24_2: C24.2 R6.1
NetC26_1: C26.1 U2.2
NetC27_2: C27.2 R8.2 R9.1 U5.1 | length 245.7
  Top Layer w15: R9.1@1395,290.5 1403.91,299.41 1470,299.41 1477.5,291.91 1483.09,291.91 1496.6,278.4 U5.1
  Top Layer w30: R8.2 R9.1 R9.1@1395,290.5
NetC28_2: C28.2 R10.2 U3.2 | length 842.5
  Top Layer w10: R10.2 440,350 522.5,432.5 522.5,727.5 570,775 v2(685,775)
  Bottom Layer w10: U3.2 684.14,627.36 684.14,781.09 685,780.23 v2(685,775)
NetC29_2: C29.2 R11.2 U4.2 | length 797.2
  Top Layer w10: v2(2400,760) 2498.78,760 2577.5,681.28 2577.5,390.68 2505,318.18 R11.2
  Bottom Layer w10: U4.2 v2(2400,760)
NetC34_1: C34.1 L2.1 U5.6 | length 268.6
  Top Layer w15: U5.6 1697.21,227.2 C34.1 ; L2.1@1816,161 L2.1
  Top Layer w30: C34.1 1770.91,153.5 1823.5,153.5 L2.1
NetC34_2: C34.2 U5.7 | length 72.6
  Top Layer w15: U5.7 1697.22,252.8 C34.2
NetC35_1: C35.1 R16.2 U3.3 | length 807.4
  Top Layer w10: R16.2 540,715 577.5,752.5 694.32,752.5 706.82,765 v2(735,765)
  Bottom Layer w10: U3.3 735,710 736.14,711.14 736.14,763.86 v2(735,765)
NetC36_1: C36.1 R17.2 U4.3 | length 824.3
  Top Layer w10: v2(2455,810) 2500,810 2600,710 R17.2
  Bottom Layer w10: U4.3 2452.37,633.87 2452.37,807.37 v2(2455,810)
NetC37_1: C37.1 C38.1 C39.1 D14.1 R13.2 R19.1 U5.5 | length 194.1
  Top Layer w15: R13.2 1552,345 1589.73,307.27 1589.73,234.78 1622.55,201.95 1642.35,201.95 U5.5
NetC43_1: C43.1 D20.1 R28.2 U7.3
NetCN3_1: CN3.1 D9.1 R24.2 | length 254.8
  Top Layer w10: R24.2 625,1943.31 D9.1 622.25,1950 699.88,2027.64 728.43,2027.64 CN3.1
NetCN3_2: CN3.2 D10.1 R25.1 | length 368.5
  Bottom Layer w10: CN3.2 1037.56,2054.13 1041.69,2050 1038.63,2050 1020,2031.38 R25.1
NetCN3_3: CN3.3 D11.1 R26.2 | length 213.8
  Bottom Layer w10: R26.2 580,1915.62 614.37,1950 D11.1 622.44,1954.13 CN3.3
NetCN3_4: CN3.4 D12.1 R27.1 | length 197.1
  Bottom Layer w10: CN3.4 955.82,1954.13 955,1953.31 R27.1 ; D12.1@950.82,1944.13 D12.1
NetD3_1: D3.1 Q2.1 R1.2 | length 27.6
  Top Layer w35: Q2.1@1027.25,929.84 Q2.1
NetD4_1: D4.1 Q1.1 R2.1 | length 19.8
  Top Layer w35: Q1.1 Q1.1@2187.77,1096.16
NetD7_1: D7.1 Q4.1 R3.2 | length 27.6
  Top Layer w35: Q4.1@1344.84,697.64 Q4.1
NetD8_1: D8.1 Q3.1 R4.1
NetD16_1: D16.1 R21.2 | length 74.4
  Top Layer w10: R21.2@377.97,2050 377.97,2116.04 D16.1
  Top Layer w20: R21.2 R21.2@381.48,2041.98
NetD17_1: D17.1 R22.2 | length 71.6
  Top Layer w10: D17.1@2720,2110 2720,2043.96 R22.2@2723.96,2040
NetD18_1: D18.1 R23.2 | length 78.8
  Top Layer w30: R23.2 2374.5,178.96 D18.1
NetD19_2: D19.2 R28.1
NetR12_2: R12.2 R13.1 U5.8 | length 145.1
  Top Layer w15: U5.8 1630.35,278.4 1630,278.75 1630,345 R12.2
NetR18_1: R18.1 U5.2 | length 91.3
  Top Layer w15: R18.1 1475,210.5 1485,220.5 1486.5,220.5 1518.45,252.45 1546.95,252.45 U5.2
P_INH1: U2.5 U3.6 | length 518.2
  Bottom Layer w10: U3.6 735,386.3 812.3,309 1048.65,309 1132.2,392.56 U2.5
P_INH2: U1.5 U4.6 | length 348.6
  Bottom Layer w10: U1.5 2246.38,368.62 2290,325 2419.74,325 2450,355.25 U4.6
P_INL1: U2.6 U3.7 | length 518.5
  Top Layer w10: v3(730,325) 956.24,325 968.24,337 v3(975,337)
  Bottom Layer w10: U3.7 685,363.24 723.24,325 v3(730,325) ; v3(975,337) 1026.65,337 1082.2,392.56 U2.6
P_INL2: U1.6 U4.7 | length 276.5
  Bottom Layer w10: U1.6 2196.38,446.96 2218.06,468.65 2377.05,468.65 2400,445.7 U4.7
PGND: C1.2 C3.2 C4.2 C5.2 C6.2 C7.2 C8.2 C9.2 C10.2 C11.2 C12.2 C13.2 C14.2 C15.2 C16.2 C17.2 C18.2 C19.2 C20.2 C21.2 C22.2 C25.2 C30.2 C31.2 C32.2 C33.2 C37.2 C38.2 C39.2 C40.2 C41.2 CN1.2 CN2.2 CN4.5 CN4.6 CN7.2 CN8.2 D5.1 D5.3 D6.1 D6.3 D13.1 D14.2 D15.1 D16.2 D17.2 D18.2 D21.1 Q3.3 Q4.3 R5.2 R6.2 R7.1 R8.1 R12.1 R18.2 R20.2 U1.7 U2.7 U3.5 U4.5 U5.3 U5.4 U6.1 | length 62.4
  Top Layer w20: Q4.3@1505,705 1515,705 1545,735 Q4.3@1545,745
  other v1: 2701.67,40 2750,40 2801.67,40 2850,40 2898.33,40 2946.67,40 2995,40 160,440 3130,456.67 110,460 3173.95,481.05 160,488.33 65,490 3130,505 110,508.33 3173.95,529.38 160,536.67 65,538.33 3130,553.33 110,556.67 3173.95,577.71 160,585 65,586.67 3130,601.67 110,605 3173.95,626.05 160,633.33 65,635 3130,650 110,653.33 3173.95,674.38 65,683.33 858.19,746.78 1981.64,755.68 2029.97,755.68 2078.31,755.68 829.48,803.27 877.81,803.27 926.15,803.27 1960.92,803.26 2009.25,803.26 2057.59,803.26 2105.92,803.26 2358.95,824.38 1941.05,851.05 1989.38,851.05 2037.71,851.05 2086.05,851.05 2134.38,851.05 760.62,853.95 808.95,853.95 857.29,853.95 905.62,853.95 953.95,853.95 3145,1040 3193.95,1066.05 3145,1088.33 3193.95,1114.38 3145,1136.67 3193.95,1162.71 3145,1185 2228.95,1186.05 1038.95,1206.05 3193.95,1211.05 2158.95,1221.05 3145,1233.33 2228.95,1234.38 1093.95,1236.05 2088.95,1251.05 1038.95,1254.38 3193.95,1259.38 1153.95,1266.05 2158.95,1269.38 2228.95,1282.71 1093.95,1284.38 2088.95,1299.38 1038.95,1302.71 1153.95,1314.38 2158.95,1317.71 2228.95,1331.05 1093.95,1332.71 2088.95,1347.71 1038.95,1351.05 1153.95,1362.71 2158.95,1366.05 2228.95,1379.38 1093.95,1381.05 2088.95,1396.05 1038.95,1399.38 1153.95,1411.05 2158.95,1414.38 1093.95,1429.38 2088.95,1444.38 2228.95,1446.05 1153.95,1459.38 1038.95,1481.05 2158.95,1486.05 2228.95,1494.38 1093.95,1516.05 2088.95,1521.05 1038.95,1529.38 2158.95,1534.38 2228.95,1542.71 1153.95,1546.05 100,1555 1093.95,1564.38 2088.95,1569.38 3185,1575 1038.95,1577.71 2158.95,1582.71 50,1585 2228.95,1591.05 1153.95,1594.38 100,1603.33 1093.95,1612.71 2088.95,1617.71 3185,1623.33 1038.95,1626.05 2158.95,1631.05 50,1633.33 2228.95,1639.38 1153.95,1642.71 100,1651.67 1093.95,1661.05 2088.95,1666.05 3185,1671.67 1038.95,1674.38 2158.95,1679.38 50,1681.67 1153.95,1691.05 100,1700 1093.95,1709.38 2088.95,1714.38 3185,1720 50,1730 1153.95,1739.38 100,1748.33 3185,1768.33 50,1778.33 1153.33,1805 1201.67,1805 1250,1805 1298.33,1805 1355,1805 1403.33,1805 1451.67,1805 1500,1805 1548.33,1805 1620,1805 1668.33,1805 1716.67,1805 1765,1805 1813.33,1805 1875,1810 1923.33,1810 1971.67,1810 2020,1810 2068.33,1810 1330,1850 1378.33,1850 1426.67,1850 1475,1850 1523.33,1850 1590,1850 1638.33,1850 1686.67,1850 1735,1850 1783.33,1850 1176.67,1855 1225,1855 1273.33,1855 1845,1855 1893.33,1855 1941.67,1855 1990,1855 2038.33,1855 1355,1905 1403.33,1905 1451.67,1905 1500,1905 1548.33,1905 1615,1905 1663.33,1905 1711.67,1905 1760,1905 1808.33,1905 1870,1905 1918.33,1905 1966.67,1905 2015,1905 2063.33,1905 1251.42,1907.95 1299.75,1907.95 1273.33,1960 1330,1960 1378.33,1960 1426.67,1960 1475,1960 1523.33,1960 1585,1960 1633.33,1960 1681.67,1960 1730,1960 1778.33,1960 1840,1965 1888.33,1965 1936.67,1965 1985,1965 2033.33,1965
  other v2: 1710,75 1755,75 1800,75 1845,75 1890,75 1935,75 1525,162.5 585,200 615,245 665,245 585,290 1135,300 2915,335 2865,365 2965,370 2915,385 457.5,411.04 2865,415 2965,420 2915,430.62 835,440 880,440 1475,455 1580,455 1665,455 455,460 2865,460.62 2965,465.62 2915,475 1432,485 1525,490 1630,500 2865,505 455,505.62 2965,510 1475,525 1580,525 455,550 1525,550 1432,555 1630,560 500,570 1475,590 1580,590 1255,597.5 1845,600 1905,600 460,605 1215,615 1435,620 1525,620 1630,620 500,630 1825,640 1875,640 1935,640 1585,645 1770,645 1255,650 1475,650 460,670 1215,675 1435,675 1630,685 1755,685 1815,685 500,690 590,705 1590,715 1945,715 1995,715 2050,715 2095,715 1785,720 460,725 1435,740 1630,745 1935,755 1755,760 1815,760 1590,770 2660,770 2704.38,770 2750,770 2800,770 442,790 1725,812 1635,815 1590,840 1690,840 445,845 2840,865 2795,875 445,885 1635,890 2840,915 445,925 2795,925 1590,930 2840,960.62 445,965 1635,975 2795,980 445,1005 2840,1005 2795,1035 445,1045 2840,1060 445,1085 2795,1085 2840,1110 445,1125 2795,1130.62 2840,1155.62 445,1165 2795,1175 2840,1200 445,1205 2795,1240 2740,1270 2795,1290 2740,1320 2795,1335.62 2740,1365.62 2795,1380 2740,1410 1550,1495 1594.38,1495 1640,1495 1690,1495 1525,1560 1569.38,1560 1615,1560 1665,1560 3140,1600 1550,1625 1594.38,1625 1640,1625 1690,1625 3140,1644.38 1525,1685 1569.38,1685 1615,1685 1665,1685 3140,1690 1550,1740 1594.38,1740 1640,1740 1690,1740 3140,1740
PVCC5V: C40.1 R20.1 U3.8 U4.8 U6.2 | length 1731.6
  Top Layer w10: 700,400 710,390 1515.87,390 1520.87,395 2144.75,395 2189.75,350 v2(2330,350)
  Bottom Layer w10: v2(2330,350) 2350,370 U4.8
  other v2: 600.77,399.23 600,440
SW1: C23.1 C26.2 D1.1 D1.3 D5.2 L1.1 Q2.3 Q4.2 U2.4 | length 312
  Bottom Layer w20: v1@1285,937.25 v1(1285,938.33)
  Bottom Layer w35: C26.2 1214.41,729.41 1245,760 1245,898.33 v1(1285,938.33) ; v1@1240,1005 v1(1240,1008.33)
  other v1: 1340,908.33 1435,908.33 1515,908.33 1390,938.33 1475,939.31 1340,956.67 1435,956.67 1515,956.67 1285,986.67 1390,986.67 1475,987.65 1340,1005 1435,1005 1515,1005 1285,1035 1390,1035 1475,1035.98 1340,1053.33 1435,1053.33 1515,1053.33 1240,1056.67 1285,1083.33 1390,1083.33 1475,1084.31 1195,1086.67 1340,1101.67 1435,1101.67 1515,1101.67 1240,1105 1285,1131.67 1390,1131.67 1475,1132.65 1195,1135 1240,1153.33 1195,1183.33 1240,1201.67 1195,1231.67
SW2: C2.1 C24.1 D2.1 D2.3 D6.2 L1.2 Q1.3 Q3.2 U1.4 | length 311.9
  Bottom Layer w20: 2175,935 D2.3@2204.15,935 ; D2.3@2198.28,902.32 2198.28,917.91 D2.3
  Bottom Layer w35: D2.3@2198.28,902.32 2244.39,856.21 2272.07,856.21 2285.78,842.5 2286.39,842.5 2302.5,826.39 2302.5,753.61 2283.3,734.41 C2.1
  other v1: 1700,913.33 1810,913.33 1945,913.33 1755,938.33 1875,938.33 2010,943.33 1700,961.67 1810,961.67 1945,961.67 1755,986.67 1875,986.67 2010,991.67 1700,1010 1810,1010 1945,1010 1755,1035 1875,1035 2010,1040 1700,1058.33 1810,1058.33 1945,1058.33 1755,1083.33 1875,1083.33 2010,1088.33 1700,1106.67 1810,1106.67 1945,1106.67 1755,1131.67 1875,1131.67 2010,1136.67
VCC13V: C1.1 C25.1 C27.1 C30.1 C31.1 C32.1 C33.1 C41.1 D19.1 L2.2 R9.2 R23.1 U1.1 U2.1 U6.3 | length 2144
  Top Layer w15: C27.1@1470,350.59 1502.21,350.59 1511,359.38 1511,360.38 1528.12,377.5 2137.5,377.5 v2(2230,285)
  Top Layer w20: v2(910,355) 910.77,355.77 947.1,355.77 961.33,370 996.67,370 1007.17,359.5 R9.2@1395,359.5 ; R9.2 1395,353.09 1402.5,345.59 C27.1
  Bottom Layer w20: v2(875,620) 907.5,587.5 907.5,473.04 910,470.54 v2(910,355) ; v2(1980,615) 1980,560 2055,485 2055,381.72 2076.72,360 2155,360 v2(2230,285)
  other v2: 2160,285 1980,665 875,670
VCC24V: CN2.1 CN5.2 D15.2 R14.2 R15.2 R19.2 R25.2 R26.1 | length 2424.4
  Top Layer w10: v2(580,1820) 580,1536.72 606.72,1510 671.95,1510 690,1491.95 R15.2
  Top Layer w35: CN2.1 395.48,551.37 395.48,321.67 383.5,309.69 383.5,102.48 416.57,69.4 574.86,69.4 631.32,125.87 CN5.2 731.18,217.09 R19.2
  Bottom Layer w10: v2(580,1820) R26.1 ; R14.2 686.63,1496.63 700,1510 750,1510 785,1545 785,1760 822.14,1797.14 969.86,1797.14 969.86,1799.11 1018.03,1847.29 R25.2
  other v1: 238.33,720 286.67,720 335,720 383.33,720 256.67,765 305,765 353.33,765 238.33,805 286.67,805 335,805 383.33,805 241.67,860 290,860 338.33,860 386.67,860 265,910 313.33,910 361.67,910 241.67,955 290,955 338.33,955 386.67,955 530,1340 605,1340 675,1340 641.78,1371.7 718.46,1372.26 500,1375 570,1375 500,1414.02 570,1414.02 640,1414.02 710,1414.02
VCC24V_H: F1.1 R15.1 R24.1 | length 498.4
  Top Layer w10: R24.1 625,1805 605,1785 605,1540 615,1530 673.92,1530 690,1546.08 R15.1
VCC24V_IN: CN1.1 CN4.1 D13.2 R14.1 R21.1 R27.2 | length 3808.5
  Top Layer w10: R21.1 310,2039.5 310,1696.81 CN1.1@462.83,1543.98
  Top Layer w20: CN1.1 462.83,1543.98 462.83,1607.17 404.14,1665.86 404.14,1949.14 425,1970 425,2031.41 508.59,2115 1136.38,2115 1263.05,1988.33 1824.44,1988.33 1890.24,2054.13 CN4.1
  Bottom Layer w10: R14.1 686.63,1538.37 700,1525 743.79,1525 770,1551.21 770,1766.21 815.92,1812.14 917.89,1812.14 953.03,1847.29 R27.2
VCC_CAP: CN4.3 CN7.1 CN8.1 D21.2 F2.2 R22.1 | length 1283
  Top Layer w10: R22.1 2796,2025 2808.5,2012.5 2808.5,1786.5 2977.84,1617.16 2990,1605
  Top Layer w20: CN4.3 2440.21,1901.13 2618.55,1901.13 2977.84,1541.84 CN7.1 ; R22.1 R22.1@2794.75,2024.75
  other v1: 2880,1448.33 2930,1471.67 2650,1483.33 2880,1496.67 2595,1518.33 2650,1531.67 2880,1545 2595,1566.67 2650,1580 2535,1588.33 2880,1593.33 2595,1615 2650,1628.33 2535,1636.67 2595,1663.33 2650,1676.67 2535,1685
pads on no net: CN1.x CN2.0 CN3.5 CN3.6 CN7.0 CN8.x L1.0

## Polygon pours and split planes (outlines as drawn)
PGND on Bottom Layer "PGND_L02_P000" (solid, remove dead copper, pour order 0): -85,2255 -75,2265 3280,2265 3280,85 3065,-130 2985,-50 -120,-50
PGND on Top Layer "PGND_L01_P001" (solid, remove dead copper, pour order 1): -55,2250 3270,2250 3395,2125 3385,2115 3385,-160 -70,-160 -85,-175

## Keep-outs
Keep-Out Layer:
  the board outline again, w10

## Other copper
Top Layer:
  region net VCC_CAP: 2870,1435 2870,770 2825,725 2745,725 2695,675 2695,585 2740,540 2920,540 3005,625 3005,1435
  region net PVCC5V: 705,505 710,500 710,390 685,365 580,365 580,400 590,410 590,485
  region net NetC43_1: 2165,495 2165,430 2205.43,389.57 2305.09,389.57 2305.09,594.91 2305,595 2308.26,598.26 2308.26,647.22 2265.9,647.22 2255.18,636.5 2255.18,530.18 2230,505 2175,505
  region net DVCC5V: 2362.28,722.71 2361.63,722.06 2361.63,642.61 2381.33,622.91 2404.66,622.91 2424.1,603.46 2423.32,602.69 2423.32,506.26 2522.09,506.26 2536.86,521.03 2536.86,656.86 2517.94,675.79 2444.32,675.79 2424.88,695.23 2424.88,728.93 2362.41,728.93 2361.89,729.45
  region net NetD19_2: 2150,665 2230,665 2235,660 2235,525 2150,525 2150,530
  region net VCC13V: 1965,685 2110,685 2110,600 2110,595 2110,590 1965,590
  region net PVCC5V: 580,540 700,540 705,535 705,505 685,485 670,485 655,470 655,410 645,400 580,400
  region net VCC13V: 755,530 890,530 905,545 905,690 855,690 840,675 840,620 810,590 755,590
  region net NetC34_1: 1697.21,227.2 1695,224.99 1695,110 1700,105 1910,105 1910,170 1905,175 1770,175 1725,220 1725,230
  region net NetC37_1: 885,140 1251.6,140 1274,162.4 1345.99,162.4 1345.99,90 1590.59,90 1615,114.41 1615,207.5 1626.1,207.5 1670,207.5 1670,60 1665,55 885,55
  pour cut-out: 2310,275 2315,270 2420,270 2420,130 2315,130
  region net VCC13V: 1770.81,240 1770.81,232.22 2059.58,232.22 2099.65,192.14 2100.1,192.59 2257.28,192.59 2285.33,164.54 2330.3,164.54 2330.3,274.7 2299.31,305.69 1770.81,305.69
  region net LO1: 960,540 1285,540 1285,430 1275,420 960,420
  region net NetD4_1: 2175,820 2300,820 2310,830 2310,1080 2245,1145 2110,1145 2110,1075 2130,1055 2230,1055 2250,1035 2250,895 2220,865 2175,865
  region net HO2: 2180,680 2175,685 2175,800 2290,800 2295,795 2295,700 2275,680
  region net NetD8_1: 1660,790 1660,545 1775,430 1890,430 1900,440 1900,555 1820,555 1730,645 1730,790
  region net LO2: 1915.38,439.7 2109.7,439.7 2135,465 2135,540 2105,570 1913.65,570
  region net NetD7_1: 1315,785 1295,765 1295,435 1300,430 1385,430 1410,455 1410,785
  region net NetD3_1: 995,960 995,880 1040,835 1175,835 1175,900 1115,960
  region net HO1: 1065,680 1170,680 1170,812.34 1170.06,812.4 1064.44,812.4
  region net NetC3_1: 666.56,1240 710,1240 635,1165 630,1165
  region net NetC3_1: 705,905 665,865 665,830 660,830 655,830 565,830 565,1220 585,1240 666.56,1240
  region net VCC_CAP: 2315,1550 2510,1550 2625,1435 3055,1435 3055,1615 2770,1615 2675,1710 2315,1710
  region net NetC13_1: 2321.8,885 2645.2,885 2670,909.8 2670,1325 2635,1360 2515,1360 2475,1400 2475,1485 2305,1485 2295,1475 2295,1200 2320,1175
  region net NetC3_1: 797.36,1480.05 999.73,1480.05 1002.41,1477.37 1002.41,1218.25 907.11,1122.95 907.92,1122.14 907.92,905.71 664.05,905.71 664.05,1204.05 710.66,1250.66 796.6,1336.6 796.6,1480.72
  region net VCC24V_H: 625,1605 755,1605 794.61,1565.39 794.61,1550 935,1550 955,1570 955,1735 935,1755 625,1755
  region net VCC24V: 755,1430 755,1315 707.84,1267.84 437.84,1267.84 420,1250 420,550 210,550 210,1405 235,1430
  region net SW2: 1669.56,876.79 1670.79,878.02 2093.89,878.02 2114.18,898.31 2114.8,897.7 2231.03,897.7 2231.03,1023.77 2232.87,1025.61 2108.65,1025.61 2036.69,1097.56 2036.69,1366.92 1671.4,1366.92 1670.17,1365.69
  region net SW1: 995,1005 1190,1005 1320,875 1550,875 1550,1370 1190,1370 1190,1245 1090,1145 995,1145
  pour cut-out: 695,2110 905,2110 905,1845 695,1845
Bottom Layer:
  region net NetC23_2: 1185,1490 cw(c1205,1490) 1205,1510 1475,1510 cw(c1475,1490) 1495,1490 1495,1420 cw(c1480,1420) 1480,1405 1205,1405 cw(c1205,1425) 1185,1425
  region net NetC24_2: 1755,1495 1755,1420 ccw(c1760,1420) 1760,1415 2035,1415 ccw(c2035,1425) 2045,1425 2045,1500 ccw(c2030,1500) 2030,1515 1775,1515 ccw(c1775,1495)
  region net VCC24V: 630,1430 485,1430 ccw(c485,1400) 455,1400 455,1330 ccw(c460,1330) 460,1325 750,1325 ccw(c750,1340) 765,1340 765,1422.5 ccw(c762.5,1422.5) 762.5,1425
  region net VCC24V: 612.5,1365 ccw(c622.5,1365) 622.5,1355 757.5,1355 ccw(c757.5,1360) 762.5,1360 762.5,1425 ccw(c757.5,1425) 757.5,1430 617.5,1430 ccw(c617.5,1425) 612.5,1425
  region net VCC13V: 2135,260 2255,260 2255,305 2135,305
  region net DVCC5V: 2425,505 2520,505 2535,520 2535,565 2396.97,565 2365,596.97 2365,670 2330.69,670 2329.41,671.28 2327.86,669.73 2327.86,545.48 2367.57,505.77
  region net PVCC5V: 580,510 650,510 650,370 645,365 580,365
  region net VCC13V: 995,595 835,595 835,690 990,690 995,685
  region net LO2: 2085,380 2110,380 2110,465 2120,475 2120,535 2075,535 2075,470 2085,460
  region net VCC13V: 2110,595 1965,595 1965,685 2110,685
  region net NetC2_2: 2275,765 2275,815 2165,815 2120,770 2120,685 2135,670 2135,595 2160,595 2160,670 2165,675 2165,750 2180,765
  region net HO2: 2185,595 2210,595 2210,670 2217.21,677.21 2217.21,746.9 2177.35,746.9 2177.35,678.72 2184.81,671.25
  region net SW2: 2270,590 2270,665 2295,690 2295,750 2230,750 2230,590
  region net NetC26_1: 1020,595 1045,595 1045,670 1055,680 1055,755 1065,765 1160,765 1160,810 1045,810 1005,770 1005,685 1020,670
  region net SW1: 1120,595 1150,595 1170,615 1170,745 1120,745
  region net LO1: 995,380 995,455 1005,465 1005,530 958.78,530 958.78,467.2 970,455.98 970,380
  region net HO1: 1072.22,658.97 1071.9,658.65 1071.9,594.09 1094.37,594.09 1094.58,593.88 1094.58,659.58 1106.33,671.33 1106.33,745 1065,745 1065,670
  region net VCC24V: 210,1145 420,1145 420,550 210,550
  region net NetC13_1: 2315,1065 2315,1180 2325,1180 2380,1235 2385,1230 2385,1050
  region net NetC13_1: 2475,1400 2515,1360 2635,1360 2680,1315 2680,825 2570,825 2570,860 2545,885 2260,885 2260,1038.25 2260.49,1038.74 2293.74,1038.74 2370,1115 2370,1735 2475,1735
  region net NetC3_1: 895,1730 895,1240 970,1165 970,1001.41 971.37,1000.04 914.19,942.86 914.19,898.3 705.48,898.3 660,852.82 660,825 560,825 560,1300 575,1315 775,1315 810,1350 810,1730
  region net VCC_CAP: 3055,1615 3055,1435 2625,1435 2510,1550 2510,1710 2675,1710 2770,1615 2780,1615
  region net SW1: 995,1005 1190,1005 1320,875 1550,875 1550,1370 1190,1370 1190,1245 1090,1145 995,1145
  region net SW2: 1669.56,876.79 1670.79,878.02 2093.89,878.02 2114.18,898.31 2114.8,897.7 2231.03,897.7 2231.03,1023.77 2232.87,1025.61 2108.65,1025.61 2036.69,1097.56 2036.69,1366.92 1671.4,1366.92 1670.17,1365.69
  region net VCC24V_IN: 750,1605 750,1755 625,1755 490,1620 185,1620 185,1455 425,1455 535,1455 620,1540 620,1605

## Silkscreen, mask and mechanical layers (free items; w line width, h text height)
Top Overlay:
  lines w20: 2790,1112.5 2790,1136.25 2790,1183.75 2790,1207.5
  text "CAP" at 3065,1286 h120
  text "VIN" at 25,1270.25 h120
  text "SuperCAP_V3" at 2805,1173.12 h90
  text "POWER_V2.0" at 2809.95,1105.21 h70
  text "HERO2025" at 2784.93,1020.9 h100
  text "2025_6_26" at 2780,954.57 h100
  text "WIRELESS" at 2829.92,821.08 h120
  text "VOUT" at 10,811.08 h120
  text "tanniu" at 755,285.23 h20
Top Solder:
  region: 2315,1385 2315,1330 2340,1305 2340,1125 2440,1125 2440,1395 2420,1415
  region: 2112.25,895.94 1895.94,895.94 1895,895 1715,1075 1715,1210 1745,1240 1905,1240 1925,1220 1925,1083.19 2043.19,965 2115,965
  region: 1115,1080 1180,1080 1265,995 1370,995 1490,1115 1490,1215 1200,1215 1130,1145 1115,1145
  region: 795,1460 796.41,1458.59 796.41,1364.85 796.41,1251.41 790,1245 790,1125 915,1125 915,1403.17 906.2,1411.97
  region: 757.97,1369.86 748,1320 605,1320 590,1335 590,1390 625,1425 735,1425
  lines w20: 1240,1055 1240,1056.67 ; 2485.74,1191.78 2485.74,1336.78 ; 2510.74,1191.78 2510.74,1336.78 ; 2578.72,1296.92 2633.72,1241.92 ; 2578.72,1331.92 2658.72,1251.92
  lines w70: 313.43,633.43 313.43,1258.43 426.7,1371.7 641.78,1371.7 ; 2373.58,1606.7 2608.3,1606.7 2686.9,1528.1 2991.57,1528.1
Bottom Solder:
  region: 1125,1985 1125,1840 2065,1840 2065,1985
  lines w50: 313.43,436.57 315.71,436.57 522.29,230 ; 520,230 2575,230 2775,430 2775,433.15 3005,663.15 3005,1280 3115,1390 3115,1655 3045.04,1724.96 2991.57,1724.96
  lines w70: 478.7,1528.11 508.11,1528.11 565,1585 565,1625 620,1680 ; 619.89,1679.89 724.89,1679.89
Mechanical 1:
  lines w10: 3235,125.87 3235,2055 ; 3235.24,125 cw(c3117.13,125) 3117.13,6.89 125,6.89 cw(c125,125) 6.89,125 6.89,2054.13 cw(c125,2054.13) 125,2172.24 3117.13,2172.24 cw(c3117.13,2054.13) 3235.24,2054.13
Mechanical 6:
  circle w10: c125,2054.13 r99.06
  circle w10: c3117.13,2054.13 r99.06
  circle w10: c3117.13,125 r99.06
  circle w10: c125,125.87 r99.06
  lines w8: 1035,1155 2210,1155 2210,2175 1035,2175 1035,2165 1035,1155

## Dimensions
6.89,125 to 3235.47,282.49 on Top Overlay